# Altium PCB WIFI_BoardV4.00.PcbDoc (part 1 of 3)
Units mil, origin at the board's own origin, x right, y up, seen from the top; angles counter-clockwise.
Board outline 4329.7 x 2342.16 mil, 2 copper layers (Top Layer, Bottom Layer), stack 61.811 mil thick; 89 components, 60 nets, 295 pads, 130 vias.
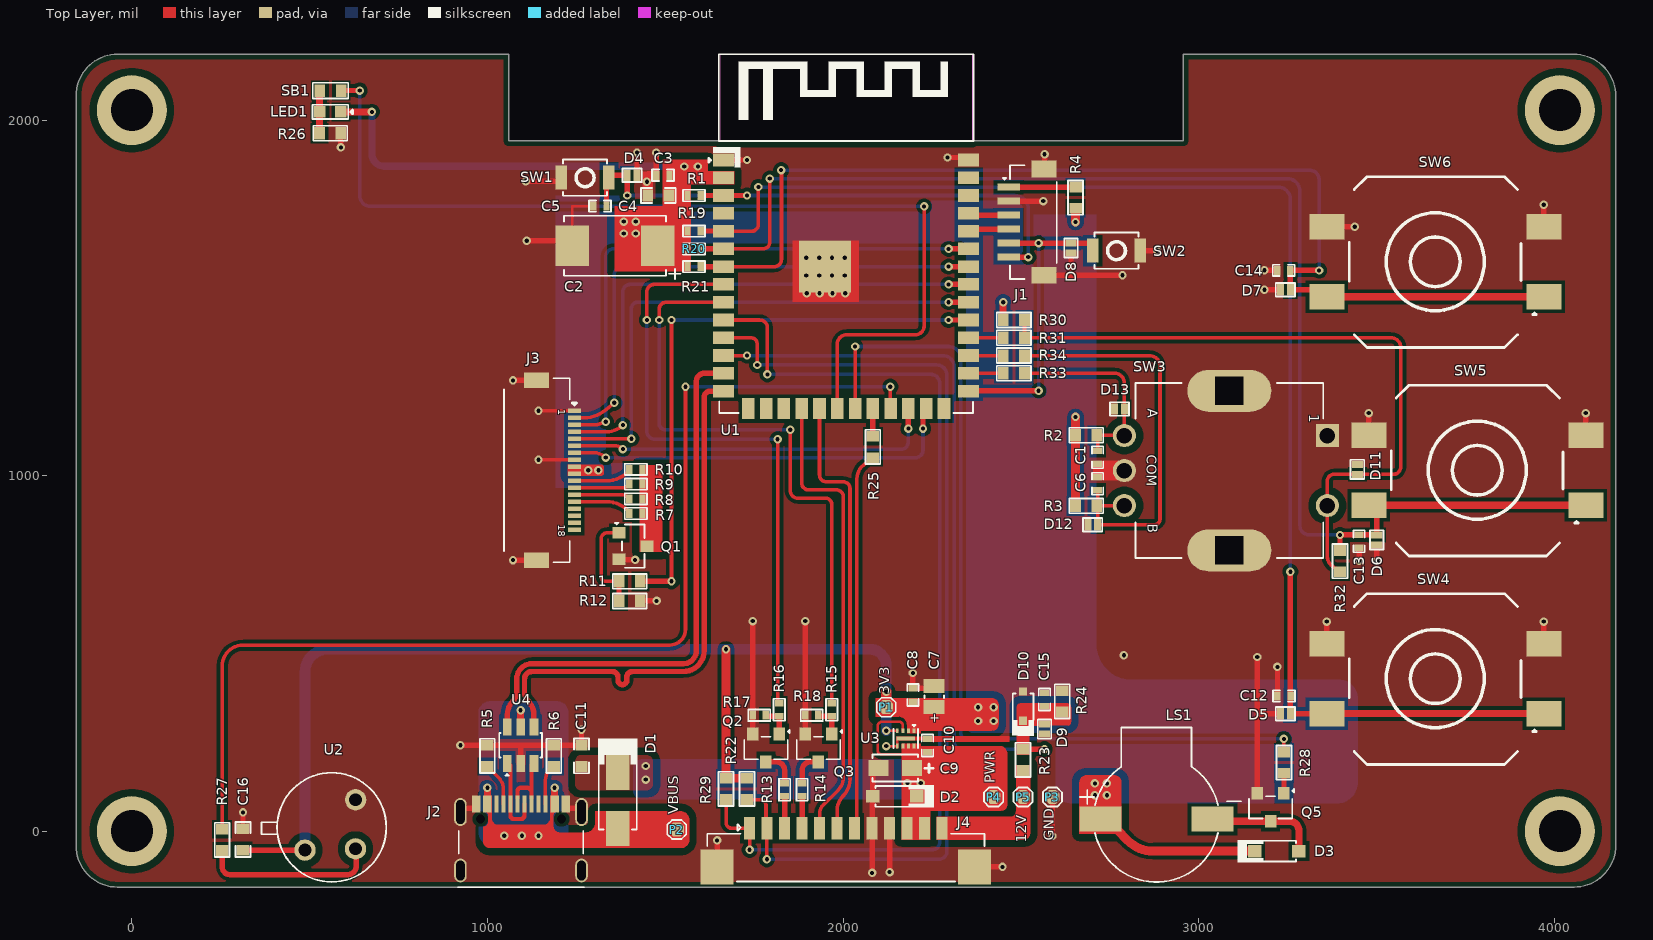
[diagram p0: Top Layer view]
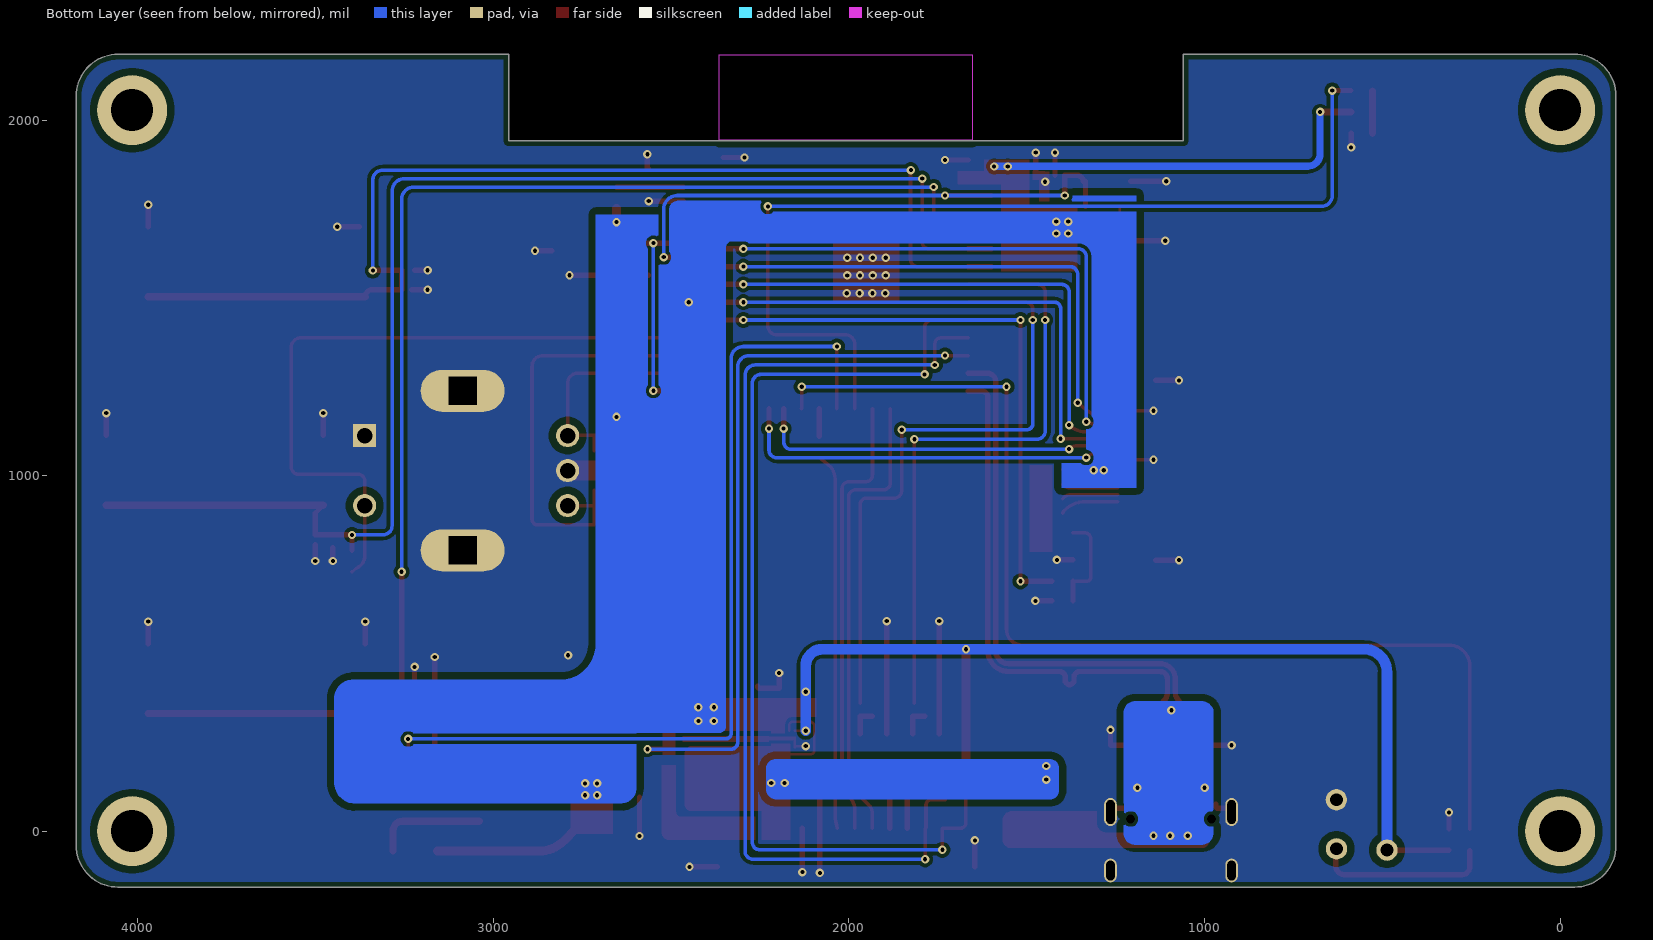
[diagram p1: Bottom Layer view, seen from below]
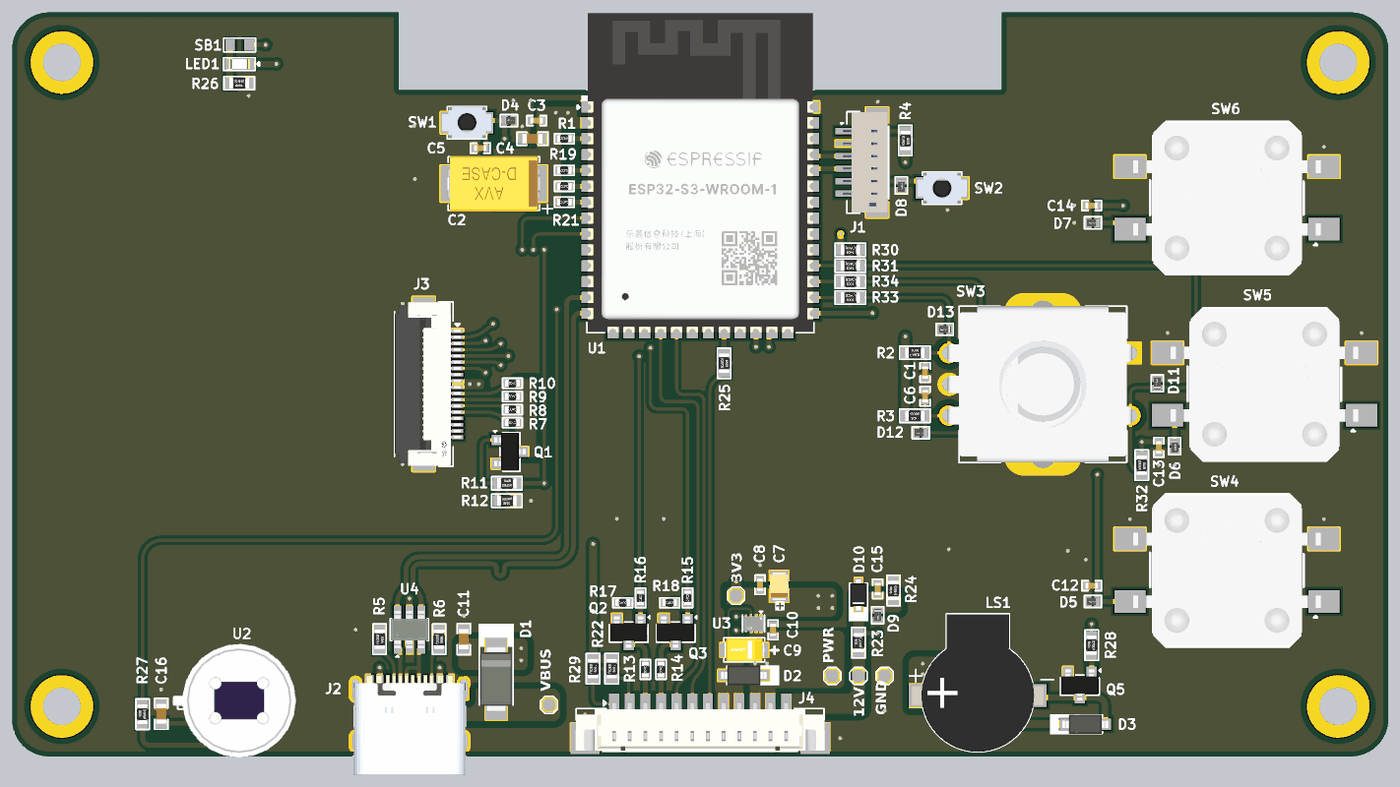
[diagram p3: 3D render of the assembled board from above, using the file's embedded part models]

## Layer stack, top to bottom
Top Solder: solder mask 0.394, Solder Resist, Dk 3.5
Top Layer: signal copper 1.378
Dielectric 1: dielectric 59.055, FR-4, Dk 4.6
Bottom Layer: signal copper 1.378
Bottom Solder: solder mask 0.394, Solder Resist, Dk 3.5

## Board outline
-156.47,-41.36 -156.47,2071.73 -156.47,2068.66 cw(c-40.09,2068.66) -40.09,2185.04 1060.01,2185.04 1060.01,1941.42 2956.91,1941.42 2956.91,2185.04 4055.12,2185.04 cw(c4055.12,2066.93) 4173.23,2066.93 4173.23,-39.63 cw(c4055.74,-39.63) 4055.74,-157.12 -40.71,-157.12 cw(c-40.71,-41.36)

## Design rules (kind name [scope] priority, off if disabled: settings)
BoardOutlineClearance [All] p1: gap=0 ignorepadtopadclearanceinfootprint=FALSE except(10: Arc-OutlineEdge; 15: Poly-OutlineEdge)
Clearance [All] p1: gap=10 ignorepadtopadclearanceinfootprint=FALSE except(4: SMDPad-SMDPad; 6: Arc-SMDPad Track-SMDPad SMDPad-Hole; 7: Arc-Arc Arc-Track Arc-Fill Arc-Region Track-Track Track-Via Track-Fill Track-Region Track-Text SMDPad-Fill SMDPad-Region THPad-THPad Via-Region Fill-Fill Fill-Region; 8: Region-Region; 20: THPad-Poly Fill-Poly Poly-Poly Poly-Region)
ComponentClearance [All] p1: gap=0 collisioncheckmode=3 verticalgap=0 showdistances=FALSE
DiffPairsRouting Diff_USB [All] p1: maxlimit=7 minlimit=7 mostfreqgap=7 toplayer_minwidth=15 toplayer_maxwidth=15 toplayer_prefwidth=15 bottomlayer_minwidth=15 bottomlayer_maxwidth=15 bottomlayer_prefwidth=15 impedanceprofiledriven=TRUE impedanceprofileid={7E0B47CC-6290-4BF2-9677-D2EBC84C2973} impedanceprofilevalue=90.000000 maxuncoupledlength=500
HoleSize [All] p1: absolutevalues=TRUE maxlimit=137.8 minlimit=1 maxpercent=80.000 minpercent=20.000
MatchedLengths [InDifferentialPairClass('DIFF_485')] p1: tolerance=1000 checknetsindiffpair=TRUE checkdiffpairvsdiffpair=FALSE checkxsignals=FALSE checkothers=FALSE
MinimumSolderMaskSliver [All] p1: minsoldermaskwidth=0
PolygonConnect [All] p1: connectstyle=Direct reliefconductorwidth=10 reliefentries=4 polygonreliefangle="90 Angle" airgapwidth=10
RoutingVias [All] p1: holewidth=11.81 width=23.62 viastyle="Through Hole" minholewidth=7.87 minwidth=15.75 maxholewidth=23.62 maxwidth=39.37
SilkToSilkClearance [All] p1: silktosilkclearance=0
SilkToSolderMaskClearance [IsPad] p1: minsilkscreentomaskgap=0 clearancetoexposedcopper=TRUE
SolderMaskExpansion [All] p1: expansion=4 istentingtop=FALSE
SupplyNets "Schematic Supply Nets_5" [InNet('3V3_WIFI')] p1: voltage=0.000
SupplyNets "Schematic Supply Nets_3" [InNet('PWR')] p2: voltage=0.000
SupplyNets "Schematic Supply Nets_2" [InNet('U_VBUS')] p3: voltage=0.000
SupplyNets "Schematic Supply Nets_1" [InNet('VCC_12V')] p4: voltage=0.000
SupplyNets "Schematic Supply Nets_7" [InNet('GND')] p5: voltage=0.000
Width [All] p1: maxlimit=100 minlimit=4 preferedwidth=6 minimp=50.000000 maximp=50.000000 favimp=50.000000
24 further rules are at their usual default settings.

## Classes and differential pairs
differential pair class USB_PROG_LINES: TYPEC USBD
net class USB_PROG: TYPEC_N TYPEC_P
differential pair TYPEC: +TYPEC_P -TYPEC_N

## Components (designator, comment, footprint, x,y, rotation, side; value= is the part's Value field where it differs from the comment)
C1 "0.01uF" Cap-0402 2715.92,1051.47 r90 top
C2 "47uF" Case-D 1358.84,1646.42 r180 top
C3 "100nF" Cap-0402 1493.52,1844.53 r0 top
C4 "22uF" Cap-0603 1480.52,1787.71 r0 top
C5 "1uF" Cap-0402 1316.39,1758 r0 top
C6 "0.01uF" Cap-0402 2715.92,977.34 r270 top
C7 "22uF" Tant-0805 2256.49,378.14 r90 top
C8 "0.1uF" Cap-0402 2196.49,383.11 r270 top value=100nF
C9 "10uF" Case-A 2146.84,177.89 r180 top
C10 "0.1uF" Cap-0402 2237.52,240.84 r270 top value=100nF
C11 "100nF" Cap-0603 1264.57,211.75 r270 top
C12 "100nF" Cap-0402 3240.22,380.2 r0 top
C13 "100nF" Cap-0402 3451.42,815.22 r90 top
C14 "100nF" Cap-0402 3239.5,1577.31 r0 top
C15 "0.1uF" Cap-0402 2566.59,370.09 r270 top
C16 "0.1uF" Cap-0603 312.52,-23.18 r90 top
D1 "SS24A" SMA 1366.29,85.89 r270 top
D2 "MMSZ5234B-7-F" SOD-123 2145.51,97.89 r0 top
D3 "1N4148W-7-F" SOD-123 3220,-56 r180 top value=2pF
D4 "LESD8D3.3CAT5G" "SOD-882 Bi Directional" 1406.74,1844.53 r180 top
D5 "LESD8D3.3CAT5G" "SOD-882 Bi Directional" 3244.22,330.55 r0 top
D6 "LESD8D3.3CAT5G" "SOD-882 Bi Directional" 3501,819.22 r90 top
D7 "LESD8D3.3CAT5G" "SOD-882 Bi Directional" 3244.22,1522.97 r0 top
D8 "LESD8D3.3CAT5G" "SOD-882 Bi Directional" 2641.01,1640.16 r90 top
D9 "LESD8D3.3CAT5G" "SOD-882 Bi Directional" 2566.59,287.32 r90 top
D10 "MM3Z3V3B" SOD323F 2506.28,351.44 r270 top
D11 "LESD8D3.3CAT5G" "SOD-882 Bi Directional" 3446.53,1017.32 r270 top
D12 "LESD8D3.3CAT5G" "SOD-882 Bi Directional" 2702.24,861.73 r0 top
D13 "LESD8D3.3CAT5G" "SOD-882 Bi Directional" 2777.55,1187.52 r0 top
J1 "Voltlink Target" "Voltlink Target" 2515.22,1713 r270 top
J2 "TYPE-C-31-M-12" TYPE-C-31-M-12_ 1094.29,-17.11 r0 top locked
J3 "F0502-B-18-15T-R" F0502-B-18-15T-R 1191.33,1015.13 r270 top
J4 "HC-1.25-12PLT" HC-1.25-12PLT 2008.06,-46.02 r0 top
LED1 "ALS-PT19-315C/L177/TR8" ALS-PT19-315C/L177/TR_ 558.41,2022.89 r180 top
LS1 "YS-SBZ9032C03R16" YS-SBZ9032C03R16_ 2881.55,34.13 r0 top
P1 "TEST POINT 0.5mm Dia" "Test-point - 0.5mm" 2121.41,348.79 r0 top
P2 "TEST POINT 0.5mm Dia" "Test-point - 0.5mm" 1532.52,4.74 r0 top
P3 "TEST POINT 0.5mm Dia" "Test-point - 0.5mm" 2589.04,95.89 r0 top
P4 "TEST POINT 0.5mm Dia" "Test-point - 0.5mm" 2423.52,95.89 r0 top
P5 "TEST POINT 0.5mm Dia" "Test-point - 0.5mm" 2506.28,95.89 r0 top
Q1 "AO3400A" sot-23 1409.59,801.67 r270 top
Q2 "BSS138" SOT-23 1783.37,234.37 r180 top
Q3 "BSS138" Sot-23 1931.01,234.37 r180 top
Q5 "MMBT5551" SOT-23 3202.52,67.5 r180 top
R1 "10K" Res-0402 1581.02,1787.71 r180 top
R2 "10K" Res-0603 2683.92,1113.4 r180 top value=10kR
R3 "10K" Res-0603 2683.92,914.97 r0 top value=10kR
R4 "0R" Res-0603 2653.92,1781.9 r90 top
R5 "5.1K" Res-0603 999.8,211.75 r90 top
R6 "5.1K" Res-0603 1186.88,211.75 r90 top
R7 "10R" Res-0402 1417.45,893.34 r180 top
R8 "10R" Res-0402 1417.45,934.72 r180 top
R9 "10R" Res-0402 1417.45,976.09 r180 top
R10 "10R" Res-0402 1417.46,1017.47 r180 top
R11 "470R" Res-0603 1400.22,702.67 r180 top
R12 "10K" Res-0603 1400.21,647.68 r0 top value=10kR
R13 "100R" Res-0402 1835.82,116.39 r270 top
R14 "0R" Res-0402 1885.03,116.39 r270 top
R15 "1K" Res-0402 1968.41,341.39 r90 top
R16 "1K" Res-0402 1820.77,341.39 r90 top
R17 "47K" Res-0402 1764.47,326.39 r0 top
R18 "47K" Res-0402 1912.1,326.39 r0 top
R19 "10K" Res-0402 1581.02,1687.71 r180 top
R20 "10K" Res-0402 1581.02,1637.71 r180 top
R21 "10K" Res-0402 1581.02,1587.71 r180 top
R22 "100K" Res-0603 1729.82,119 r90 top value=100kR
R23 "15K" Res-0603 2506.28,200.51 r270 top value=15kR
R24 "3.3K" Res-0603 2616.44,365.09 r270 top
R25 "0R" Res-0603 2083.85,1080.68 r90 top
R26 "4.7K" Res-0603 557.94,1962.89 r0 top
R27 "20K" Res-0603 253.88,-24.34 r270 top
R28 "4.7K" Res-0603 3239.92,192.89 r270 top
R29 "100K" Res-0603 1671,119 r90 top value=100kR
R30 "10K" Res-0603 2480.36,1437.71 r0 top value=10kR
R31 "0R" Res-0603 2480.36,1387.71 r0 top
R32 "DNP" Res-0603 3397.59,759.5 r90 top
R33 "0R" Res-0603 2480.36,1287.71 r0 top
R34 "0R" Res-0603 2480.36,1337.71 r0 top
SB1 "Solder Bridge 0603" "Solder Bridge" 558.9,2082.89 r180 top
SW1 "B3U-1000P" B3U-1000P 1274.59,1837.8 r180 top
SW2 "B3U-1000P" B3U-1000P 2769.13,1632.53 r0 top
SW3 "PEC11R-4215F-S0024" PEC11R-4215F-S0024 3086.47,1014.19 r270 top
SW4 "TL3300CF160Q" TL3300CF160Q. 3665.52,428.97 r180 top locked
SW5 "TL3300CF160Q" TL3300CF160Q. 3783.63,1015.19 r180 top locked
SW6 "TL3300CF160Q" TL3300CF160Q. 3665.52,1601.4 r180 top locked
U1 "ESP32-S3-WROOM-1-N8R2" "41-SMD Module" 2008.65,1538.11 r0 top locked
U2 "AS312" AS312 592.52,-16.8 r45 top
U3 "LD56100DPU33R" DFN-8(1.2x1.6) 2176.14,260.84 r270 top
U4 "USBLC6-2SC6" SOT-23-6 1093.32,241.97 r90 top

## Footprints (in the part's own frame and the unit in brackets; to place one, negate y for a bottom-side part, rotate by r counter-clockwise, add the part's x,y. Pads: shape width x height; smd on the part's side, far side on the other; paste and mask are expansions set on the pad)
"41-SMD Module" [mm]
  rect 1.5x0.9 smd: 1(-8.75,8.88) 2(-8.75,7.61) 3(-8.75,6.34) 4(-8.75,5.07) 5(-8.75,3.8) 6(-8.75,2.53) 7(-8.75,1.26) 8(-8.75,-0.01) 9(-8.75,-1.28) 10(-8.75,-2.55) 11(-8.75,-3.82) 12(-8.75,-5.09) 13(-8.75,-6.36) 14(-8.75,-7.63) 27(8.75,-7.63) 28(8.75,-6.36) 29(8.75,-5.09) 30(8.75,-3.82) 31(8.75,-2.55) 32(8.75,-1.28) 33(8.75,-0.01) 34(8.75,1.26) 35(8.75,2.53) 36(8.75,3.8) 37(8.75,5.07) 38(8.75,6.34) 39(8.75,7.61) 40(8.75,8.88)
  rect 0.9x1.5 smd: 15(-6.98,-8.88) 16(-5.71,-8.88) 17(-4.44,-8.88) 18(-3.17,-8.88) 19(-1.9,-8.88) 20(-0.63,-8.88) 21(0.64,-8.88) 22(1.91,-8.88) 23(3.18,-8.88) 24(4.45,-8.88) 25(5.72,-8.88) 26(6.99,-8.88)
  rect 3.7x3.7 smd: 41(-1.5,1.26)
  Keep-Out Layer region: -9.042,10.287 9.042,10.287 9.042,16.383 -9.042,16.383
  silkscreen extent -9.8,-9.2 9.09,16.43, body extent -9.01,-9.14 9.01,16.37, height 3.16
ALS-PT19-315C/L177/TR_ [mm]
  rect 0.82x0.82 smd: 1(-0.75,0) 2(0.75,0)
  silkscreen extent -1.57,-0.51 1.27,0.51, body extent -0.85,-0.4 0.85,0.4, height 0.6
AS312 [mil]
  round 60 hole 36 paste-99999 mask+2: 1(-100.4,48.95) 2(2.6,-48.95) 3(100.4,48.35)
  silkscreen extent -156,-113 152,195, body extent -179,-130 179,228, height 177
B3U-1000P [mm] "SWITCH TACTILE SPST-NO 0.05A 12V"
  rect 0.82x1.72 smd: 1(-1.7,0) 2(1.7,0)
  silkscreen extent -1.57,-1.3 1.57,1.3, body extent -2,-1.26 2,1.24, height 1.6
Cap-0402 [mil]
  rect 18x25 smd mask+2.36: 1(-18.5,0) 2(18.5,0)
  silkscreen extent -31,-16 31,16, body extent -20,-10 20,10, height 19
Cap-0603 [mil]
  rect 30x35 smd mask+2.36: 1(-30,0) 2(30,0)
  silkscreen extent -49,-21 49,21, body extent -32,-16 31,16, height 34
Case-A [mm]
  rect 1.42x1.13 smd: 1(-1.2,0) 2(1.2,0)
  silkscreen extent -2.72,-0.97 1.63,0.97, body extent -1.6,-0.9 1.6,0.9, height 1.8
Case-D [mm]
  rect 2.4x2.9 smd: 1(-3.05,0) 2(3.05,0)
  silkscreen extent -4.7,-2.15 3.65,2.39, body extent -3.7,-2.22 3.7,2.22, height 3.01
DFN-8(1.2x1.6) [mm]
  rect 0.345x0.2 smd paste+0 mask+0.051: 1(-0.547,0.6) 2(-0.547,0.2) 3(-0.547,-0.2) 4(-0.547,-0.6) 5(0.547,-0.6) 6(0.547,-0.2) 7(0.547,0.2) 8(0.547,0.6)
  rect 0.3x1.3 smd paste+0 mask+0.051: 9(0,0)
  silkscreen extent -0.98,-0.88 0.68,0.88, body extent -0.61,-0.81 0.61,0.81, height 0.4
F0502-B-18-15T-R [mm]
  rect 0.3x0.92 smd: 1(-4.25,1.35) 2(-3.75,1.35) 3(-3.25,1.35) 4(-2.75,1.35) 5(-2.25,1.35) 6(-1.75,1.35) 7(-1.25,1.35) 8(-0.75,1.35) 9(-0.25,1.35) 10(0.25,1.35) 11(0.75,1.35) 12(1.25,1.35) 13(1.75,1.35) 14(2.25,1.35) 15(2.75,1.35) 16(3.25,1.35) 17(3.75,1.35) 18(4.25,1.35)
  rect 1.1x1.8 smd: MP1(-6.42,-1.35) MP2(6.42,-1.35)
  silkscreen extent -6.58,-3.68 6.58,1.5, body extent -6.55,-3.66 6.55,1.69, height 2.03
HC-1.25-12PLT [mm]
  rect 0.8x1.62 smd paste+0 mask+0.05: 1(-6.875,1.38) 2(-5.625,1.38) 3(-4.375,1.38) 4(-3.125,1.38) 5(-1.875,1.38) 6(-0.625,1.38) 7(0.625,1.38) 8(1.875,1.38) 9(3.125,1.38) 10(4.375,1.38) 11(5.625,1.38) 12(6.875,1.38)
  rect 2.35x2.5 smd paste+0 mask+0.05: MP1(-9.2,-1.38) MP2(9.2,-1.38)
  silkscreen extent -9.91,-2.42 9.91,1.66, body extent -9.97,-2.38 9.97,1.52, height 4.75
PEC11R-4215F-S0024 [mm]
  rect 1.65x1.65 hole 1.1: 1(-2.5,7)
  round 1.65 hole 1.1: 2(2.5,7) A(-2.5,-7.5) B(2.5,-7.5) COM(0,-7.5)
  oval 3x6 hole 2 square: S1(-5.7,0) S2(5.7,0)
  silkscreen extent -6.25,-6.7 6.25,6.7, body extent -6.93,-7.6 6.93,7.1, height 21.5
Res-0402 [mil]
  rect 18x25 smd mask+2.17: 1(-18.5,0) 2(18.5,0)
  silkscreen extent -32,-17 32,16, body extent -23,-11 23,11, height 16
Res-0603 [mil]
  rect 30x35 smd: 1(-30,0) 2(30,0)
  silkscreen extent -48,-21 48,21, body extent -31,-17 31,17, height 18
SMA [mm]
  rect 2.5x1.7 smd: 1(-2,0) 2(2,0)
  silkscreen extent -4.45,-1.42 2.06,1.42, body extent -2.6,-1.3 2.6,1.3, height 2.4
SOD323F [mm]
  rect 0.6x0.6 smd: 1(-1.05,0) 2(1.05,0)
  silkscreen extent -0.91,-0.79 2.11,0.79, body extent -1.25,-0.68 1.25,0.68, height 1
SOD-123 [mm]
  rect 0.95x0.9 smd: 1(-1.575,0) 2(1.575,0)
  silkscreen extent -1.37,-0.8 2.82,0.8, body extent -1.82,-0.78 1.83,0.78, height 1.5
"SOD-882 Bi Directional" [mm]
  rect 0.5x0.8 smd mask+0.055: 1(-0.35,0) 2(0.35,0)
  silkscreen extent -0.69,-0.48 0.69,0.48, body extent -0.49,-0.29 0.49,0.29, height 0.48
"Solder Bridge" [mil] "Solder Bridge ON"
  rect 30x35 smd: 1(-30,0) 2(30,0)
  silkscreen extent -50,-22 50,22
sot-23 [mm] "TRANS NPN 40V 0.6A SOT23"
  rect 0.82x0.92 smd: 1(-0.95,-1) 2(0.95,-1) 3(0,1)
  silkscreen extent -1.68,-1.3 1.55,0.81, body extent -1.5,-1.25 1.5,1.25, height 1.05
SOT-23 [mm] "TRANS NPN 40V 0.6A SOT23"
  rect 0.82x0.92 smd: 1(-0.95,-1) 2(0.95,-1) 3(0,1)
  silkscreen extent -1.68,-1.3 1.55,0.81, body extent -1.5,-1.25 1.5,1.25, height 1.05
Sot-23 [mm] "TRANS NPN 40V 0.6A SOT23"
  rect 0.82x0.92 smd: 1(-0.95,-1) 2(0.95,-1) 3(0,1)
  silkscreen extent -1.68,-1.3 1.55,0.81, body extent -1.5,-1.25 1.5,1.25, height 1.05
SOT-23-6 [mm]
  rect 1.22x0.62 smd: 1(-1.31,0.95) 2(-1.31,0) 3(-1.31,-0.95) 4(1.31,-0.95) 5(1.31,0) 6(1.31,0.95)
  silkscreen extent -2.18,-1.52 0.86,1.52, body extent -1.5,-1.5 1.5,1.5, height 1.47
Tant-0805 [mm]
  rect 1x1.5 smd: 1(-0.75,0) 2(0.75,0)
  silkscreen extent -0.1,-0.7 0.1,0.7, body extent -1.1,-0.72 1.1,0.72, height 1.24
"Test-point - 0.5mm" [mm]
  oct 1x1 smd: 1(0,0)
  silkscreen extent -0.68,-0.68 0.68,0.68
TL3300CF160Q. [mm] "SWITCH TACTILE SPST-NO 0.05A 12V"
  rect 2.5x1.8 smd: 1(-7.75,2.5) 2(7.75,2.5) 3(-7.75,-2.5) 4(7.75,-2.5)
  silkscreen extent -7.21,-6.07 6.15,6.12, body extent -7.5,-5.98 7.5,6.02, height 8.77
TYPE-C-31-M-12_ [mm]
  rect 0.6x1.2 smd: A1/B12(-3.2,2.375) A4/B9(-2.4,2.375) B1/A12(3.2,2.375) B4/A9(2.4,2.375)
  rect 0.3x1.2 smd: A5(-1.25,2.375) A6(-0.25,2.375) A7(0.25,2.375) A8(1.25,2.375) B5(1.75,2.375) B6(0.75,2.375) B7(-0.75,2.375) B8(-1.75,2.375)
  round 0 hole 0.62 unplated: MH(-2.89,1.305) MH(2.89,1.305)
  oval 0.9x2 hole 0.6 slot 1.7 at 90 deg: S1(4.325,1.805) S4(-4.325,1.805)
  oval 0.9x1.7 hole 0.6 slot 1.4 at 90 deg: S2(4.325,-2.375) S3(-4.325,-2.375)
  silkscreen extent -4.5,-3.57 4.5,0.44, body extent -4.47,-5.01 4.47,2.89, height 3.31
"Voltlink Target" [mm]
  rect 0.5x1.6 smd: 1(-2.5,-1.262) 2(-1.5,-1.262) 3(-0.5,-1.262) 4(0.5,-1.262) 5(1.5,-1.262) 6(2.5,-1.262)
  rect 1.2x1.8 smd: MP1(-3.8,1.262) MP2(3.8,1.262)
  silkscreen extent -4.06,-1.68 4.06,2.17, body extent -4,-1.49 4,2.11, height 4.25
YS-SBZ9032C03R16_ [mm] "NO 2700Hz 85dB @ 3V, 10cm 3V F9mm SMD,9x3.2mm Buzzers RoHS"
  rect 3x1.8 smd: 1(-4,0) 2(4,0)
  silkscreen extent -5.46,-4.5 6.06,6.54, body extent -5.25,-4.5 5.25,6.5, height 3.3

## Part data
C1 C6: library part CC0402KRX5R8BB103, "CAP CER 10000PF 25V X5R 0402", LCSC Part Number=C576726, Manufacturer=Yageo, Supplier Part Number 1=2101932, Category="Ceramic Capacitors", ComponentLink1Description=LCSC, ComponentLink1URL=https://www.lcsc.com/product-detail/Multilayer-Ceramic-Capacitors-MLCC-SMD-SMT_YAGEO-CC0402KRX5R8BB103_C576726.html, Item Type=Capacitor, Manufacturer Part Number=CC0402KRX5R8BB103, Pricing 1="10000=0.00290, 40000=0.00270, 150000=0.00260, 250000=0.00250, 500000=0.00240 (USD)", RoHS=Yes, RoHS Compliant=Yes, Stock 1=140000, Supplier 1="Future Electronics"
C2: library part T495D476K025ATE250, "CAP TANT 47UF 10% 25V 2917", LCSC Part Number=C1952924, Manufacturer=KEMET, ComponentLink1Description=http://www.mouser.com/ds/2/212/KEM_T2071_T495_COTS-1104607.pdf?src-supplier=Mouser, ComponentLink1URL=http://www.mouser.com/ds/2/212/KEM_T2071_T495_COTS-1104607.pdf?src-supplier=Mouser, ComponentLink2Description=http://components.arrow.com/part/dataview/43511451S7939771N7429?src-supplier=Arrow+Electronics, ComponentLink2URL=http://components.arrow.com/part/dataview/43511451S7939771N7429?src-supplier=Arrow+Electronics, ComponentLink3Description=https://datasheet.octopart.com/T495D476K025ATE250-Kemet-datasheet-27203288.pdf?src-supplier=Element14, ComponentLink3URL=https://datasheet.octopart.com/T495D476K025ATE250-Kemet-datasheet-27203288.pdf?src-supplier=Element14, ComponentLink4Description=https://datasheet.octopart.com/T495D476K025ATE250-Kemet-datasheet-9873475.pdf?src-supplier=Newark, ComponentLink4URL=https://datasheet.octopart.com/T495D476K025ATE250-Kemet-datasheet-9873475.pdf?src-supplier=Newark, ComponentLink5Description=http://www.kemet.com/Lists/ProductCatalog/Attachments/261/KEM_T2009_T495.pdf?src-supplier=Avnet, ComponentLink5URL=http://www.kemet.com/Lists/ProductCatalog/Attachments/261/KEM_T2009_T495.pdf?src-supplier=Avnet, ComponentLink6Description=https://api.kemet.com/component-edge/download/datasheet/T495D476K025ATE250.pdf?src-supplier=Digikey, ComponentLink6URL=https://api.kemet.com/component-edge/download/datasheet/T495D476K025ATE250.pdf?src-supplier=Digikey, ComponentLink7Description=https://datasheet.octopart.com/T495D476K025ATE250-KEMET-datasheet-102476631.pdf?src-supplier=Farnell, ComponentLink7URL=https://datasheet.octopart.com/T495D476K025ATE250-KEMET-datasheet-102476631.pdf?src-supplier=Farnell, ComponentLink8Description=https://datasheet.octopart.com/T495D476K025ATE250-KEMET-datasheet-130110683.pdf?src-supplier=TME, ComponentLink8URL=https://datasheet.octopart.com/T495D476K025ATE250-KEMET-datasheet-130110683.pdf?src-supplier=TME, Item Type=Capacitor, Manufacturer Part Number=T495D476K025ATE250, Pricing="1=1.82, 10=1.29, 50=1.29, 100=1.07, 1000=0.751, 10000=0.67 (USD)", RoHS=Yes, Stock=2198, Supplier=Mouser
C3 C12 C13 C14: library part CC0402KRX5R8BB104, "CAP CER 0.1UF 25V X5R 0402", Case Code (Imperial)=0402, Case Code (Metric)=1005, Dielectric=X5R, LCSC Part Number=C106256, Manufacturer=Yageo, Max Operating Temperature=85°C, Min Operating Temperature=-55°C, Resistor Type=Ceramic, Supplier Part Number 1=311-1697-1-ND, Tolerance=10%, Voltage Rating=25V, Capacitance=100nF, Case/Package=0402, Category="Ceramic Capacitors", ComponentLink1Description=http://www.mouser.com/ds/2/447/UPY-GPHC_X5R_4V-to-50V_25-1131599.pdf?src-supplier=Mouser, ComponentLink1URL=http://www.mouser.com/ds/2/447/UPY-GPHC_X5R_4V-to-50V_25-1131599.pdf?src-supplier=Mouser, ComponentLink2Description=http://www.yageo.com/documents/recent/UPY-GPHC_X5R_4V-to-50V-16.pdf?src-supplier=Future+Electronics, ComponentLink2URL=http://www.yageo.com/documents/recent/UPY-GPHC_X5R_4V-to-50V-16.pdf?src-supplier=Future+Electronics, ComponentLink3Description=http://www.yageo.com/documents/recent/UPY-GPHC_X5R_4V-to-50V_25.pdf?src-supplier=Digi-Key, ComponentLink3URL=http://www.yageo.com/documents/recent/UPY-GPHC_X5R_4V-to-50V_25.pdf?src-supplier=Digi-Key, Depth=0.5mm, Halogen Free="Halogen Free", Item Type=Capacitor, Lead Free="Lead Free", Length=0.039inch, Manufacturer Part Number=CC0402KRX5R8BB104, Mount="Surface Mount", Packaging="Tape and Reel", Pricing 1="1=0.10000, 10=0.03800, 50=0.02100, 100=0.01710, 500=0.01224, 1000=0.00961, 2500=0.00874, 5000=0.00804 (USD)", RoHS=Yes, RoHS Compliant=Yes, Series=CC, Stock 1=4598218, Supplier 1=Digi-Key, Thickness=0.022inch, Voltage Rating (DC)=25V, Width=0.02inch
C4: library part CC0603MRX5R6BB226, "CAP CER 22UF 10V X5R 0603", Case Code (Imperial)=0603, Case Code (Metric)=1608, Dielectric=X5R, LCSC Part Number=C109447, Manufacturer=Yageo, Max Operating Temperature=85°C, Min Operating Temperature=-55°C, Package Quantity=4000, Supplier Part Number 1=311-1819-1-ND, Tolerance=20%, Voltage Rating=10V, Capacitance=22uF, Case/Package=0603, Category="Ceramic Capacitors", ComponentLink1Description=http://www.mouser.com/ds/2/447/Yageo_UPY-GP_NP0_16V-to-50V_9-358835.pdf?src-supplier=Mouser, ComponentLink1URL=http://www.mouser.com/ds/2/447/Yageo_UPY-GP_NP0_16V-to-50V_9-358835.pdf?src-supplier=Mouser, ComponentLink2Description=http://www.yageo.com/documents/recent/UPY-GPHC_X5R_4V-to-50V_25.pdf?src-supplier=Digi-Key, ComponentLink2URL=http://www.yageo.com/documents/recent/UPY-GPHC_X5R_4V-to-50V_25.pdf?src-supplier=Digi-Key, Halogen Free="Halogen Free", Height=0.8mm, Item Type=Capacitor, Lead Free="Lead Free", Length=0.063inch, Manufacturer Part Number=CC0603MRX5R6BB226, Mount="Surface Mount", Packaging="Tape and Reel", Pricing 1="1=0.68000, 10=0.48000, 50=0.36300, 100=0.31610, 500=0.23416, 1000=0.19903 (USD)", RoHS=Yes, RoHS Compliant=Yes, Stock 1=19628, Supplier 1=Digi-Key, Termination=SMD/SMT, Thickness=0.035inch, Voltage Rating (DC)=10V, Weight=7.1E-05oz, Width=0.8mm
C5: library part GRM155C71C105KE11D, "CAP CER 1UF 16V X7S 0402", Case/Package=343Case, Dielectric=1542DielectricType, LCSC Part Number=C576449, Manufacturer=Murata, Max Operating Temperature=125°C, Min Operating Temperature=-55°C, Tolerance=10%, Voltage Rating=16V, Height=600um, Item Type=Capacitors, Length=1mm, Manufacturer Part Number=GRM155C71C105KE11D, Material=4241ConductorMaterial, Pricing="1=0.11, 10=0.041, 50=0.041, 100=0.026, 1000=0.023, 10000=0.016 (USD)", RoHS=No, Stock=16102, Supplier=Mouser, Thickness=500um, Voltage Rating (DC)=16V, Width=500um
C7: library part TCTP1A226M8R, "22uF 10V 5Ω ±20% 0805 Tantalum Capacitors ROHS", LCSC Part Number=C2859526, Manufacturer=Rohm, Package=0805, ComponentLink1Description=LCSC, ComponentLink1URL=https://www.lcsc.com/product-detail/Tantalum-Capacitors_ROHM-Semicon-TCTP1A226M8R_C2859526.html, Item Type=Capacitor, Manufacturer Part Number=TCTP1A226M8R
C8 C10: library part CC0402JRX7R7BB104, "CAP CER 0.1UF 16V X7R 0402", Case Code (Imperial)=0402, Case Code (Metric)=1005, Dielectric=X7R, LCSC Part Number=C541464, Manufacturer=Yageo, Max Operating Temperature=125°C, Min Operating Temperature=-55°C, Package Quantity=10000, Supplier Part Number=311-1676-1-ND, Tolerance=5%, Voltage Rating=16V, Case/Package=0402, Category="Ceramic Capacitors", ComponentLink1Description=https://datasheet.ciiva.com/13210/upy-gphc-x7r-6-3v-to-50v-8-12304-13210152.pdf?src-supplier=Mouser, ComponentLink1URL=https://datasheet.ciiva.com/13210/upy-gphc-x7r-6-3v-to-50v-8-12304-13210152.pdf?src-supplier=Mouser, Construction=Flat, Halogen Free="Halogen Free", Height=0.5mm, Item Type=Capacitor, Lead Free="Lead Free", Length=0.039inch, Manufacturer Part Number=CC0402JRX7R7BB104, Material=4241ConductorMaterial, Mounting Technology="Surface Mount", Packaging="Tape and Reel", Pricing="1=0.1, 10=0.046, 50=0.0262, 100=0.0203, 500=0.01528, 1000=0.012, 2500=0.01091, 5000=0.01004 (USD)", RoHS=Yes, RoHS Compliant=Yes, Series=CC, Stock=1659111, Supplier=Digikey, Thickness=0.022inch, Voltage Rating (DC)=16V, Width=0.02inch
C9: library part T491A106K016AT, "CAP TANT 10UF 10% 16V 1206", LCSC Part Number=C110055, Manufacturer=KEMET, Supplier Part Number 1=80-T491A106K016, Category="Tantalum Capacitors", ComponentLink1Description=https://datasheet.ciiva.com/34302/1573257-34302505.pdf?src-supplier=Jameco, ComponentLink1URL=https://datasheet.ciiva.com/34302/1573257-34302505.pdf?src-supplier=Jameco, ComponentLink2Description=https://datasheet.ciiva.com/7696/1732745-7696294.pdf?src-supplier=Element14, ComponentLink2URL=https://datasheet.ciiva.com/7696/1732745-7696294.pdf?src-supplier=Element14, ComponentLink3Description=https://datasheet.ciiva.com/12882/kem-t2005-t491-12882730.pdf?src-supplier=Mouser, ComponentLink3URL=https://datasheet.ciiva.com/12882/kem-t2005-t491-12882730.pdf?src-supplier=Mouser, ComponentLink4Description=https://datasheet.ciiva.com/6248/kem-t2005-t491-6248087.pdf?src-supplier=Digi-Key, ComponentLink4URL=https://datasheet.ciiva.com/6248/kem-t2005-t491-6248087.pdf?src-supplier=Digi-Key, ComponentLink5Description=https://datasheet.ciiva.com/6248/kem-t2005-t491-6248088.pdf?src-supplier=Digi-Key, ComponentLink5URL=https://datasheet.ciiva.com/6248/kem-t2005-t491-6248088.pdf?src-supplier=Digi-Key, ComponentLink6Description=https://datasheet.ciiva.com/6248/kem-t2005-t491-6248089.pdf?src-supplier=Digi-Key, ComponentLink6URL=https://datasheet.ciiva.com/6248/kem-t2005-t491-6248089.pdf?src-supplier=Digi-Key, ComponentLink7Description=https://datasheet.ciiva.com/14113/t491serie-eng-tds-14113132.pdf?src-supplier=Distrelec, ComponentLink7URL=https://datasheet.ciiva.com/14113/t491serie-eng-tds-14113132.pdf?src-supplier=Distrelec, ComponentLink8Description=https://datasheet.ciiva.com/14605/70095774-14605543.pdf?src-supplier=Allied+Electronics, ComponentLink8URL=https://datasheet.ciiva.com/14605/70095774-14605543.pdf?src-supplier=Allied+Electronics, ComponentLink9Description=https://datasheet.ciiva.com/14586/70095774-14586694.pdf?src-supplier=Allied+Electronics, ComponentLink9URL=https://datasheet.ciiva.com/14586/70095774-14586694.pdf?src-supplier=Allied+Electronics, ComponentLink10Description=https://datasheet.ciiva.com/39123/kem-t2005-t491-39123278.pdf?src-supplier=Onlinecomponents.com, ComponentLink10URL=https://datasheet.ciiva.com/39123/kem-t2005-t491-39123278.pdf?src-supplier=Onlinecomponents.com, ComponentLink11Description=https://datasheet.ciiva.com/7696/1854511-7696293.pdf?src-supplier=Element14, ComponentLink11URL=https://datasheet.ciiva.com/7696/1854511-7696293.pdf?src-supplier=Element14, ComponentLink12Description=https://datasheet.ciiva.com/7696/1854511-7696295.pdf?src-supplier=Element14, ComponentLink12URL=https://datasheet.ciiva.com/7696/1854511-7696295.pdf?src-supplier=Element14, ComponentLink13Description=https://datasheet.ciiva.com/7696/1446014-7696296.pdf?src-supplier=Element14, ComponentLink13URL=https://datasheet.ciiva.com/7696/1446014-7696296.pdf?src-supplier=Element14, ComponentLink14Description=https://datasheet.ciiva.com/7696/1923792-7696431.pdf?src-supplier=Element14, ComponentLink14URL=https://datasheet.ciiva.com/7696/1923792-7696431.pdf?src-supplier=Element14, ComponentLink15Description=https://datasheet.ciiva.com/29244/458306-da-01-de-kondensator-10uf-3216-10pr-16v-85c-29244588.pdf?src-supplier=Conrad, ComponentLink15URL=https://datasheet.ciiva.com/29244/458306-da-01-de-kondensator-10uf-3216-10pr-16v-85c-29244588.pdf?src-supplier=Conrad, Item Type=Capacitor, Manufacturer Part Number=T491A106K016AT, Pricing 1="1=0.34, 10=0.214, 50=0.214, 100=0.163, 1000=0.118, 10000=0.096 (USD)", RoHS=Yes, Stock 1=340138, Supplier 1=Mouser
C11: library part CC0603KRX5R9BB104, "CAP CER 0.1UF 50V X5R 0603", Case Code (Imperial)=0603, Case Code (Metric)=1608, Dielectric=X5R, LCSC Part Number=C110022, Manufacturer=Yageo, Max Operating Temperature=85°C, Min Operating Temperature=-55°C, Package Quantity=4000, Supplier Part Number 1=311-4046-1-ND, Tolerance=10%, Voltage Rating=50V, Capacitance=100nF, Case/Package=0603, Category="Ceramic Capacitors", ComponentLink1Description=http://www.mouser.com/ds/2/447/Yageo_UPY-GP_NP0_16V-to-50V_9-358835.pdf?src-supplier=Mouser, ComponentLink1URL=http://www.mouser.com/ds/2/447/Yageo_UPY-GP_NP0_16V-to-50V_9-358835.pdf?src-supplier=Mouser, ComponentLink2Description=https://www.yageo.com/upload/media/product/productsearch/datasheet/mlcc/UPY-GPHC_X5R_4V-to-50V_26.pdf?src-supplier=Digi-Key, ComponentLink2URL=https://www.yageo.com/upload/media/product/productsearch/datasheet/mlcc/UPY-GPHC_X5R_4V-to-50V_26.pdf?src-supplier=Digi-Key, ComponentLink3Description=http://www.yageo.com/exep/pages/download/literatures/ProductSelectionGuide%202014_Final_2.pdf?src-supplier=Digi-Key, ComponentLink3URL=http://www.yageo.com/exep/pages/download/literatures/ProductSelectionGuide%202014_Final_2.pdf?src-supplier=Digi-Key, Halogen Free="Halogen Free", Item Type=Capacitor, Lead Free="Lead Free", Length=0.063inch, Manufacturer Part Number=CC0603KRX5R9BB104, Mount="Surface Mount", Packaging="Tape and Reel", Pricing 1="1=0.10000, 10=0.05200, 50=0.02820, 100=0.02310, 500=0.01648, 1000=0.01294 (USD)", RoHS=Yes, Stock 1=152253, Supplier 1=Digi-Key, Termination=SMD/SMT, Thickness=0.035inch, Voltage Rating (DC)=50V, Weight=7.1E-05oz, Width=0.031inch
C15: library part C1005X5R1H104K050BB, "CAP CER 0.1UF 50V X5R 0402", Capacitance=100nF, Case Code (Imperial)=0402, Case Code (Metric)=1005, Dielectric=X5R, Dielectric Material=Ceramic, LCSC Part Number=C2181865, Manufacturer=TDK, Max Operating Temperature=85°C, Min Operating Temperature=-55°C, Package Quantity=1, Supplier Part Number 1=445-5942-1-ND, Tolerance=10%, Voltage=50V, Case/Package=0402, ComponentLink1Description=https://product.tdk.com/info/en/catalog/spec/mlccspec_commercial_general_midvoltage_en.pdf?src-supplier=Digi-Key, ComponentLink1URL=https://product.tdk.com/info/en/catalog/spec/mlccspec_commercial_general_midvoltage_en.pdf?src-supplier=Digi-Key, ComponentLink2Description=http://www.tdk.co.jp/tefe02/e413_c.pdf?src-supplier=Future+Electronics, ComponentLink2URL=http://www.tdk.co.jp/tefe02/e413_c.pdf?src-supplier=Future+Electronics, ComponentLink3Description=https://www.verical.com/server-webapp/html/getDatasheet?partID=743571&src-supplier=Verical, ComponentLink3URL=https://www.verical.com/server-webapp/html/getDatasheet?partID=743571&src-supplier=Verical, ComponentLink4Description=http://www.tdk.co.jp/tefe02/e412_c.pdf?src-supplier=Avnet+Europe, ComponentLink4URL=http://www.tdk.co.jp/tefe02/e412_c.pdf?src-supplier=Avnet+Europe, Construction=Flat, Depth=0.5mm, Height=0.5mm, Item Type=Capacitor, Lead Free="Lead Free", Length=1mm, Manufacturer Part Number=C1005X5R1H104K050BB, Mount="Surface Mount", Packaging="Tape and Reel", Pricing 1="1=0.12, 10=0.09, 50=0.049, 100=0.04, 500=0.02858, 1000=0.02245, 2500=0.02041, 5000=0.01878 (USD)", Radiation Hardening=No, REACH SVHC="No SVHC", Resistor Type=Ceramic, RoHS Compliant=Yes, Series=C, Stock 1=1455182, Supplier 1=Digi-Key, Termination=SMD/SMT, Thickness=0.022inch, Voltage Rating=50V, Voltage Rating (DC)=50V, Weight=2.3E-05oz, Width=0.02inch
C16: library part CC0603ZRY5V9BB104, "CAP CER 0.1UF 50V Y5V 0603", Capacitance=100nF, Case Code (Imperial)=0603, Case Code (Metric)=1608, Dielectric=Y5V, LCSC Part Number=C106221, Manufacturer=Yageo, Max Operating Temperature=85°C, Min Operating Temperature=-30°C, Package Quantity=1, Supplier Part Number 1=311-1343-1-ND, Tolerance=80%, Voltage=50V, Case/Package=0603, ComponentLink1Description=http://www.yageo.com/documents/recent/UPY-GPHC_Y5V_6.3V-to-50V_8.pdf?src-supplier=Digi-Key, ComponentLink1URL=http://www.yageo.com/documents/recent/UPY-GPHC_Y5V_6.3V-to-50V_8.pdf?src-supplier=Digi-Key, ComponentLink2Description=http://www.yageo.com/documents/recent/UPY-GPHC_Y5V_6.3V-to-50V_5.pdf?src-supplier=Avnet+Europe, ComponentLink2URL=http://www.yageo.com/documents/recent/UPY-GPHC_Y5V_6.3V-to-50V_5.pdf?src-supplier=Avnet+Europe, ComponentLink3Description=https://www.verical.com/server-webapp/html/getDatasheet?partID=403611&src-supplier=Verical, ComponentLink3URL=https://www.verical.com/server-webapp/html/getDatasheet?partID=403611&src-supplier=Verical, ComponentLink4Description=http://www.mouser.com/ds/2/447/Yageo_UPY-GP_NP0_16V-to-50V_9-358835.pdf?src-supplier=Mouser, ComponentLink4URL=http://www.mouser.com/ds/2/447/Yageo_UPY-GP_NP0_16V-to-50V_9-358835.pdf?src-supplier=Mouser, ComponentLink5Description=http://www.farnell.com/datasheets/1132289.pdf?src-supplier=Element14, ComponentLink5URL=http://www.farnell.com/datasheets/1132289.pdf?src-supplier=Element14, Composition=Ceramic, Depth=0.8mm, Halogen Free="Halogen Free", Height=0.8mm, Item Type=Capacitor, Lead Free="Lead Free", Length=1.6mm, Manufacturer Part Number=CC0603ZRY5V9BB104, Mount="Surface Mount", Number of Pins=2, Packaging="Tape and Reel", Pricing 1="1=0.1, 10=0.075, 100=0.0334, 500=0.02386, 1000=0.01874 (USD)", Radiation Hardening=No, REACH SVHC="No SVHC", Stock 1=15000880, Supplier 1=Digi-Key, Termination=SMD/SMT, Thickness=0.035inch, Voltage Rating=50V, Voltage Rating (DC)=50V, Width=0.031inch
D1: "40V 500mV@2A 2A SMA(DO-214AC) Schottky Barrier Diodes (SBD) ROHS", LCSC Part Number=C2886579, Manufacturer="Guangdong Hottech", Package=SMA(DO-214AC), ComponentLink1Description=LCSC, ComponentLink1URL=https://www.lcsc.com/product-detail/Schottky-Barrier-Diodes-SBD_Guangdong-Hottech-SS24A_C2886579.html, Manufacturer Part Number=SS24A
D2: "DIODE ZENER 6.2V 500MW SOD123", Manufacturer=Diodes, Power Rating=500mW, Supplier Part Number=4181776, Voltage Rating (DC)=6.2V, Category="Zener Diodes", ComponentLink1Description=https://datasheet.ciiva.com/15142/getdatasheetpartid-61110-15142283.pdf?src-supplier=Verical, ComponentLink1URL=https://datasheet.ciiva.com/15142/getdatasheetpartid-61110-15142283.pdf?src-supplier=Verical, ComponentLink2Description=https://datasheet.ciiva.com/27052/1541132-27052413.pdf?src-supplier=Jameco, ComponentLink2URL=https://datasheet.ciiva.com/27052/1541132-27052413.pdf?src-supplier=Jameco, ComponentLink3Description=https://datasheet.ciiva.com/890/ds18010-890520.pdf?src-supplier=Digikey, ComponentLink3URL=https://datasheet.ciiva.com/890/ds18010-890520.pdf?src-supplier=Digikey, ComponentLink4Description=https://datasheet.ciiva.com/890/ds18010-890521.pdf?src-supplier=Digikey, ComponentLink4URL=https://datasheet.ciiva.com/890/ds18010-890521.pdf?src-supplier=Digikey, ComponentLink5Description=https://datasheet.ciiva.com/890/ds18010-890522.pdf?src-supplier=Digikey, ComponentLink5URL=https://datasheet.ciiva.com/890/ds18010-890522.pdf?src-supplier=Digikey, Lead Free=5697LeadFree, Manufacturer Part Number=MMSZ5234B-7-F, Pricing="3000=0.0211, 9000=0.0203, 30000=0.0195, 60000=0.0191, 120000=0.0183 (USD)", RoHS=Yes, Stock=81000, Supplier="Future Electronics"
D3: "DIODE GEN PURP 100V 300MA SOD123", Average Rectified Current=300mA, Current Rating=150mA, Forward Voltage=1.25V, LCSC Part Number=C83528, Manufacturer=Diodes, Max Forward Surge Current (Ifsm)=2A, Max Operating Temperature=150°C, Max Repetitive Reverse Voltage (Vrrm)=100V, Max Reverse Current=1uA, Min Operating Temperature=-65°C, Package Quantity=3000, Power Dissipation=400mW, Supplier Part Number 1=7634694, Voltage Rating (DC)=75V, Category="Rectifier Diodes", ComponentLink1Description=https://datasheet.ciiva.com/1179/1915529-1179304.pdf?src-supplier=Element14, ComponentLink1URL=https://datasheet.ciiva.com/1179/1915529-1179304.pdf?src-supplier=Element14, ComponentLink2Description=https://datasheet.ciiva.com/22695/1915529-22695239.pdf?src-supplier=Element14, ComponentLink2URL=https://datasheet.ciiva.com/22695/1915529-22695239.pdf?src-supplier=Element14, ComponentLink3Description=https://datasheet.ciiva.com/8300/ds30086-8300392.pdf?src-supplier=Avnet, ComponentLink3URL=https://datasheet.ciiva.com/8300/ds30086-8300392.pdf?src-supplier=Avnet, ComponentLink4Description=https://datasheet.ciiva.com/15219/getdatasheetpartid-110030-15219548.pdf?src-supplier=Verical, ComponentLink4URL=https://datasheet.ciiva.com/15219/getdatasheetpartid-110030-15219548.pdf?src-supplier=Verical, ComponentLink5Description=https://datasheet.ciiva.com/8303/ds30086-8303197.pdf?src-supplier=Avnet, ComponentLink5URL=https://datasheet.ciiva.com/8303/ds30086-8303197.pdf?src-supplier=Avnet, ComponentLink6Description=https://datasheet.ciiva.com/911/ds30086-911735.pdf?src-supplier=Digi-Key, ComponentLink6URL=https://datasheet.ciiva.com/911/ds30086-911735.pdf?src-supplier=Digi-Key, ComponentLink7Description=https://datasheet.ciiva.com/911/ds30086-911736.pdf?src-supplier=Digi-Key, ComponentLink7URL=https://datasheet.ciiva.com/911/ds30086-911736.pdf?src-supplier=Digi-Key, ComponentLink8Description=https://datasheet.ciiva.com/911/ds30086-911734.pdf?src-supplier=Digi-Key, ComponentLink8URL=https://datasheet.ciiva.com/911/ds30086-911734.pdf?src-supplier=Digi-Key, ComponentLink9Description=https://datasheet.ciiva.com/4435/ds30086-4435128.pdf?src-supplier=Mouser, ComponentLink9URL=https://datasheet.ciiva.com/4435/ds30086-4435128.pdf?src-supplier=Mouser, Contact Plating=Tin,Matte, Element Configuration=Single, Forward Current=150mA, Height=1.25mm, Item Type=Diode, Lead Free="Lead Free", Length=2.85mm, Manufacturer Part Number=1N4148W-7-F, Max Reverse Voltage (DC)=100V, Max Surge Current=2A, Mounting Technology="Surface Mount", Output Current=150mA, Packaging="Tape and Reel", Peak Non-Repetitive Surge Current=2A, Pins=2, Polarity=Standard, Power Rating=400mW, Pricing 1="3000=0.01840, 12000=0.01760, 45000=0.01690, 120000=0.01640, 300000=0.01560 (USD)", Radiation Hardening=No, Reach SVHC Compliant=Yes, Recovery Time=4ns, Reverse Recovery Time=4ns, Reverse Recovery Time-Max=4ns, RoHS=Yes, RoHS Compliant=Yes, Series=-, Stock 1=32931000, Supplier 1="Future Electronics", Voltage=100V, Weight=0.000353oz, Width=1.7mm
D4 D5 D6 D7 D8 D9 D11 D12 D13: "5V 10V 3.3V Bi-Directional SOD-882 ESD Protection Devices ROHS", LCSC Part Number=C172409, Manufacturer=LRC, Package=SOD-882, ComponentLink1Description=LCSC, ComponentLink1URL=https://www.lcsc.com/product-detail/span-style-background-color-ff0-ESD-span-Protection-Devices_LRC-LESD8D3-3CAT5G_C172409.html, Item Type="Protection Device", Manufacturer Part Number=LESD8D3.3CAT5G
D10: "DIODE ZENER 3.3V 200MW SOD323F", Forward Voltage=1V, LCSC Part Number=C2978865, Manufacturer="ON Semiconductor / Fairchild", Max Operating Temperature=150°C, Max Power Dissipation=200mW, Max Reverse Leakage Current=4.5uA, Min Operating Temperature=-65°C, Package Quantity=1, Supplier Part Number 1=MM3Z3V3BCT-ND, Test Current=5mA, Tolerance=2%, Working Voltage=3.3V, ComponentLink1Description=http://www.onsemi.com/pub/Collateral/MM3Z9V1B-D.pdf?src-supplier=Digi-Key, ComponentLink1URL=http://www.onsemi.com/pub/Collateral/MM3Z9V1B-D.pdf?src-supplier=Digi-Key, ComponentLink2Description=http://www.mouser.com/ds/2/149/MM3Z3V3B-187166.pdf?src-supplier=Mouser, ComponentLink2URL=http://www.mouser.com/ds/2/149/MM3Z3V3B-187166.pdf?src-supplier=Mouser, ComponentLink3Description=https://www.fairchildsemi.com/datasheets/MM/MM3Z9V1B.pdf?src-supplier=Avnet, ComponentLink3URL=https://www.fairchildsemi.com/datasheets/MM/MM3Z9V1B.pdf?src-supplier=Avnet, ComponentLink4Description=http://www.farnell.com/datasheets/1706525.pdf?src-supplier=Element14, ComponentLink4URL=http://www.farnell.com/datasheets/1706525.pdf?src-supplier=Element14, Element Configuration=Single, Height=1mm, Impedance=89R, Item Type=Diode, Lead Free="Lead Free", Length=1.3mm, Manufacturer Part Number=MM3Z3V3B, Mount="Surface Mount", Number of Pins=2, Packaging="Tape and Reel", Peak Reverse Current=4.5uA, Power Dissipation=200mW, Pricing 1="1=0.22, 10=0.18, 100=0.0956, 500=0.06288, 1000=0.04276 (USD)", Radiation Hardening=No, REACH SVHC="No SVHC", Stock 1=473644, Supplier 1=Digi-Key, Voltage Tolerance=2%, Weight=0.0276g, Width=1.7mm, Zener Voltage=3.3V
J1: library part C145963, "1x6P SH 1 1mm 6 SMD,P=1mm Wire To Board / Wire To Wire Connector ROHS", Manufacturer=BOOMELE, Package=SMD,P=1mm, ComponentLink1Description=LCSC, ComponentLink1URL=https://www.lcsc.com/product-detail/Wire-To-Board-Wire-To-Wire-Connector_BOOMELE-Boom-Precision-Elec-C145963_C145963.html, Item Type=Connector, LCSC Part Number=C145963, Manufacturer Part Number=C145963
J2: "5A 1 16P Female Type-C SMD USB Connectors ROHS", LCSC Part Number=C165948, Manufacturer="Korean Hroparts Elec", ComponentLink1Description=LCSC, ComponentLink1URL=https://www.lcsc.com/product-detail/USB-Connectors_Korean-Hroparts-Elec-TYPE-C-31-M-12_C165948.html, Item Type="USB Connector", Manufacturer Part Number=TYPE-C-31-M-12
J3: "Clamshell -25℃~+85℃ 18P Bottom Contact Surface Mount 0.5mm SMD,P=0.5mm FFC/FPC Connectors ROHS", LCSC Part Number=C2889974, Manufacturer=XFCN, Package=SMD,P=0.5mm, ComponentLink1Description=LCSC, ComponentLink1URL=https://www.lcsc.com/product-detail/FFC-FPC-Connectors_XFCN-F0502-B-18-15T-R_C2889974.html, Item Type="FPC Connector", Manufacturer Part Number=F0502-B-18-15T-R
J4: "1x12P 12P PicoBlade(MX 1.25) Tin 12 -25℃~+85℃ 2A 1 1.25mm Brass Surface Mount,Vertical SMD,P=1.25mm Wire To Board Connector ROHS", LCSC Part Number=C2937190, Manufacturer=HCTL, Package=SMD,P=1.25mm, ComponentLink1Description=LCSC, ComponentLink1URL=https://lcsc.com/product-detail/Wire-To-Board-Connector_HCTL-HC-1-25-12PLT_C2937190.html?s_z=n_1.25-12plt, Item Type="Wire To Board Connector", Manufacturer Part Number=HC-1.25-12PLT
LED1: "SENSOR PHOTO 630NM 2SMD", Case/Package=SMD/SMT, Collector Emitter Breakdown Voltage=5.5V, Dark Current=100nA, LCSC Part Number=C146233, Manufacturer=Everlight, Max Operating Temperature=85°C, Min Operating Temperature=-40°C, Package Quantity=1, Supplier Part Number 1=1080-1244-1-ND, Category=Sensors, ComponentLink1Description=https://datasheet.ciiva.com/12092/als-pt19-315c-l177-tr-datasheet-34741-12092024.pdf?src-supplier=Mouser, ComponentLink1URL=https://datasheet.ciiva.com/12092/als-pt19-315c-l177-tr-datasheet-34741-12092024.pdf?src-supplier=Mouser, ComponentLink2Description=https://datasheet.ciiva.com/4270/alspt19315cl177-tr8-1810-4270796.pdf?src-supplier=Arrow+Electronics, ComponentLink2URL=https://datasheet.ciiva.com/4270/alspt19315cl177-tr8-1810-4270796.pdf?src-supplier=Arrow+Electronics, Fall Time=0.22ms, Item Type="Photo Sensor", Lens Style=Flat, Manufacturer Part Number=ALS-PT19-315C/L177/TR8, Max Breakdown Voltage=5.5V, Mount="Surface Mount", Number of Elements=1, Number of Pins=2, Packaging="Tape and Reel", Polarity=NPN, Pricing 1="1=0.46000, 5=0.41800, 10=0.37100, 25=0.33200, 50=0.29180, 100=0.24880, 500=0.20576, 1000=0.17226 (USD)", Radiation Hardening=No, Rise Time=0.11ms, RoHS=Yes, RoHS Compliant=Yes, Stock 1=41849, Supplier 1=Digi-Key, Wavelength=630nm
LS1: "Externally Driven 85dB@3V,10cm 3V 2700Hz SMD,D=9mm Buzzers ROHS", LCSC Part Number=C409828, Manufacturer=Fengming, Package=SMD,D=9mm, ComponentLink1Description=LCSC, ComponentLink1URL=https://www.lcsc.com/product-detail/Buzzers_Fengming-YS-SBZ9032C03R16_C409828.html, Item Type=Buzzer, Manufacturer Part Number=YS-SBZ9032C03R16
P1 P2 P3 P4 P5: "Test Point ON", Item Type="Test Point"
Q1: "30V 5.8A 32mΩ@10V,5.8A 1.4W 1.4V@250uA N Channel SOT-23 MOSFETs ROHS", LCSC Part Number=C344010, Manufacturer=BORN, ComponentLink1Description=LCSC, ComponentLink1URL=https://www.lcsc.com/product-detail/MOSFETs_BORN-AO3400A_C344010.html, Item Type=Mosfet, Manufacturer Part Number=AO3400A
Q2 Q3: "50V 220mA 3.5Ω@10V,220mA 225mW 1.6V@1mA N Channel SOT-23 MOSFETs ROHS", LCSC Part Number=C426569, Manufacturer="Slkor(SLKORMICRO Elec.)", Package=SOT-23, ComponentLink1Description=LCSC, ComponentLink1URL=https://www.lcsc.com/product-detail/MOSFETs_Slkor-SLKORMICRO-Elec-BSS138_C426569.html, Item Type=Mosfet, Manufacturer Part Number=BSS138
Q5: "TRANS NPN 160V 0.6A SOT-23", Case/Package=SOT-23-3, Collector Base Voltage (VCBO)=180V, Collector Emitter Breakdown Voltage=160V, Collector Emitter Saturation Voltage=150mV, Collector-emitter Voltage-Max=200mV, Current Rating=600mA, Emitter Base Voltage (VEBO)=6V, LCSC Part Number=C909756, Manufacturer="ON Semiconductor", Manufacturer Part Number=MMBT5551LT1G, Max Operating Temperature=150°C, Max Power Dissipation=225mW, Min Operating Temperature=-55°C, Package Quantity=1, Power Dissipation=300mW, Supplier Part Number 1=MMBT5551LT1GOSDKR-ND, Category=BJTs, Collector Emitter Voltage (VCEO)=160V, ComponentLink14Description=LCSC, ComponentLink14URL=https://www.lcsc.com/product-detail/Bipolar-Transistors-BJT_Jiangsu-Changjing-Electronics-Technology-Co-Ltd-MMBT5551_C2145.html, Contact Plating=Tin,Matte, Element Configuration=Single, Height=0.94mm, hFE Min=80, Item Type=Transister, Lead Free="Lead Free", Length=2.9mm, Max Breakdown Voltage=160V, Max Collector Current=600mA, Number of Elements=1, Number of Pins=3, Packaging="Tape and Reel", Polarity=NPN, Pricing 1="1=0.22000, 10=0.17700, 100=0.09370, 500=0.06162, 1000=0.04190 (USD)", Radiation Hardening=No, REACH SVHC="No SVHC", RoHS=Yes, RoHS Compliant=Yes, Series=-, Supplier 1=Digi-Key, Voltage Rating (DC)=160V, Weight=0.01lb, Width=1.3mm
R1 R19 R20 R21: library part RC0402FR-0710KL, "RES 10K OHM 1% 1/16W 0402", Case Code (Imperial)=0402, Case Code (Metric)=1005, LCSC Part Number=C60490, Manufacturer=Yageo, Max Operating Temperature=155°C, Max Power Dissipation=63mW, Min Operating Temperature=-55°C, Power Rating=62.5mW, Resistance=10kR, Resistance Tolerance=1%, Resistor Type="Thick Film", Supplier Part Number 1=603-RC0402FR-0710KL, Temperature Coefficient=100ppm/°C, Voltage Rating=50V, Case/Package=0402, Category="Chip SMD Resistors", ComponentLink1Description=https://datasheet.ciiva.com/7660/38568-7660787.pdf?src-supplier=Element14, ComponentLink1URL=https://datasheet.ciiva.com/7660/38568-7660787.pdf?src-supplier=Element14, ComponentLink2Description=https://datasheet.ciiva.com/7849/1686128-7849814.pdf?src-supplier=Element14, ComponentLink2URL=https://datasheet.ciiva.com/7849/1686128-7849814.pdf?src-supplier=Element14, ComponentLink3Description=https://datasheet.ciiva.com/7983/1018594-7983486.pdf?src-supplier=Element14, ComponentLink3URL=https://datasheet.ciiva.com/7983/1018594-7983486.pdf?src-supplier=Element14, ComponentLink4Description=https://datasheet.ciiva.com/22747/1018594-22747512.pdf?src-supplier=Element14, ComponentLink4URL=https://datasheet.ciiva.com/22747/1018594-22747512.pdf?src-supplier=Element14, ComponentLink5Description=https://datasheet.ciiva.com/12667/pyu-rc0402-51-rohs-l-6-r-12667067.pdf?src-supplier=Mouser, ComponentLink5URL=https://datasheet.ciiva.com/12667/pyu-rc0402-51-rohs-l-6-r-12667067.pdf?src-supplier=Mouser, ComponentLink6Description=https://datasheet.ciiva.com/7849/1784430-7849813.pdf?src-supplier=Element14, ComponentLink6URL=https://datasheet.ciiva.com/7849/1784430-7849813.pdf?src-supplier=Element14, ComponentLink7Description=https://datasheet.ciiva.com/7849/1784430-7849815.pdf?src-supplier=Element14, ComponentLink7URL=https://datasheet.ciiva.com/7849/1784430-7849815.pdf?src-supplier=Element14, Construction=Rectangular, Depth=0.5mm, Features="Moisture Resistant", Height=0.32mm, Item Type=Resistor, Lead Free="Lead Free", Lead Pitch=0.2mm, Length=1mm, Manufacturer Part Number=RC0402FR-0710KL, Military Standard=Not, Number of Pins=2, Number of Terminations=2, Packaging="Tape and Reel", Pricing 1="1=0.10000, 10=0.01400, 50=0.01400, 100=0.00500, 1000=0.00300, 10000=0.00200 (USD)", REACH SVHC="No SVHC", RoHS=Yes, RoHS Compliant=Yes, Series=RC, Stock 1=18648329, Supplier 1=Mouser, Termination=SMD/SMT, Tolerance=1%, Voltage Rating (DC)=50V, Width=0.5mm, Working Voltage=50V
R2 R3 R12 R30: library part RK73G1JTTD1002F, "RES 10K OHM 1% 1/10W 0603", Case Code (Imperial)=0603, Case Code (Metric)=1608, LCSC Part Number=C362180, Max Operating Temperature=125°C, Min Operating Temperature=-55°C, Power Rating=100mW, Supplier Part Number=2019-RK73G1JTTD1002FCT-ND, Temperature Coefficient=50ppm/°C, Tolerance=1%, Voltage Rating=75V, Case/Package=0603, Category="Chip SMD Resistors", ComponentLink1Description=LCSC, ComponentLink2Description=http://www.mouser.com/ds/2/219/RK73G-9863.pdf?src-supplier=Mouser, ComponentLink2URL=http://www.mouser.com/ds/2/219/RK73G-9863.pdf?src-supplier=Mouser, Construction=Rectangular, Depth=0.8mm, Item Type=Resistor, Length=1.6mm, Military Standard=Not, Packaging="Tape and Reel", Pricing="1=0.22, 10=0.118, 50=0.0812, 100=0.0699, 500=0.0513, 1000=0.04545 (USD)", RoHS=Yes, RoHS Compliant=Yes, Series=RK73G, Stock=249394, Supplier=Digi-Key, Termination=SMD/SMT
R4 R25 R31 R32 R33 R34: library part RC0603JR-070RL, "RES 0 OHM JUMPER 1/10W 0603", Case Code (Imperial)=0603, Case Code (Metric)=1608, LCSC Part Number=C95177, Manufacturer=Yageo, Max Operating Temperature=155°C, Max Power Dissipation=100mW, Min Operating Temperature=-55°C, Package Quantity=5000, Resistance=0mR, Resistance Tolerance=5%, Resistor Type="Thick Film", Supplier Part Number 1=311-0.0GRCT-ND, Temperature Coefficient=200ppm/°C, Tolerance=1%, Voltage Rating=50V, Case/Package=0603, Category="Chip SMD Resistors", Construction=Rectangular, Contact Plating=Tin,Matte, Depth=0.8mm, Features="Moisture Resistant", Height=0.45mm, Item Type=Resistor, Lead Free="Lead Free", Length=1.6mm, Manufacturer Part Number=RC0603JR-070RL, Military Standard=Not, Number of Pins=2, Number of Terminations=2, Packaging="Tape and Reel", Power Rating=100mW, Pricing 1="1=0.10000, 10=0.01700, 25=0.01240, 50=0.00960, 100=0.00700, 250=0.00536, 500=0.00430, 1000=0.00316 (USD)", Radiation Hardening=No, Reach SVHC Compliant="No SVHC", RoHS=Yes, RoHS Compliant=Yes, Series=RC, Size Code=0603, Stock 1=18081776, Supplier 1=Digi-Key, Technology="THICK FILM", Termination=SMD/SMT, Voltage Rating (DC)=50V, Width=0.8mm